# Altium PCB electronic_dc_load_v2.PcbDoc (part 3 of 4)
Units mm, origin at the board's own origin, x right, y up, seen from the top; angles counter-clockwise.
Board outline 170 x 170 mm, 4 copper layers (Top Layer, Int1(GND), Int2, Bottom Layer(PWR)), stack 1.607 mm thick; 177 components, 118 nets, 502 pads, 141 vias.
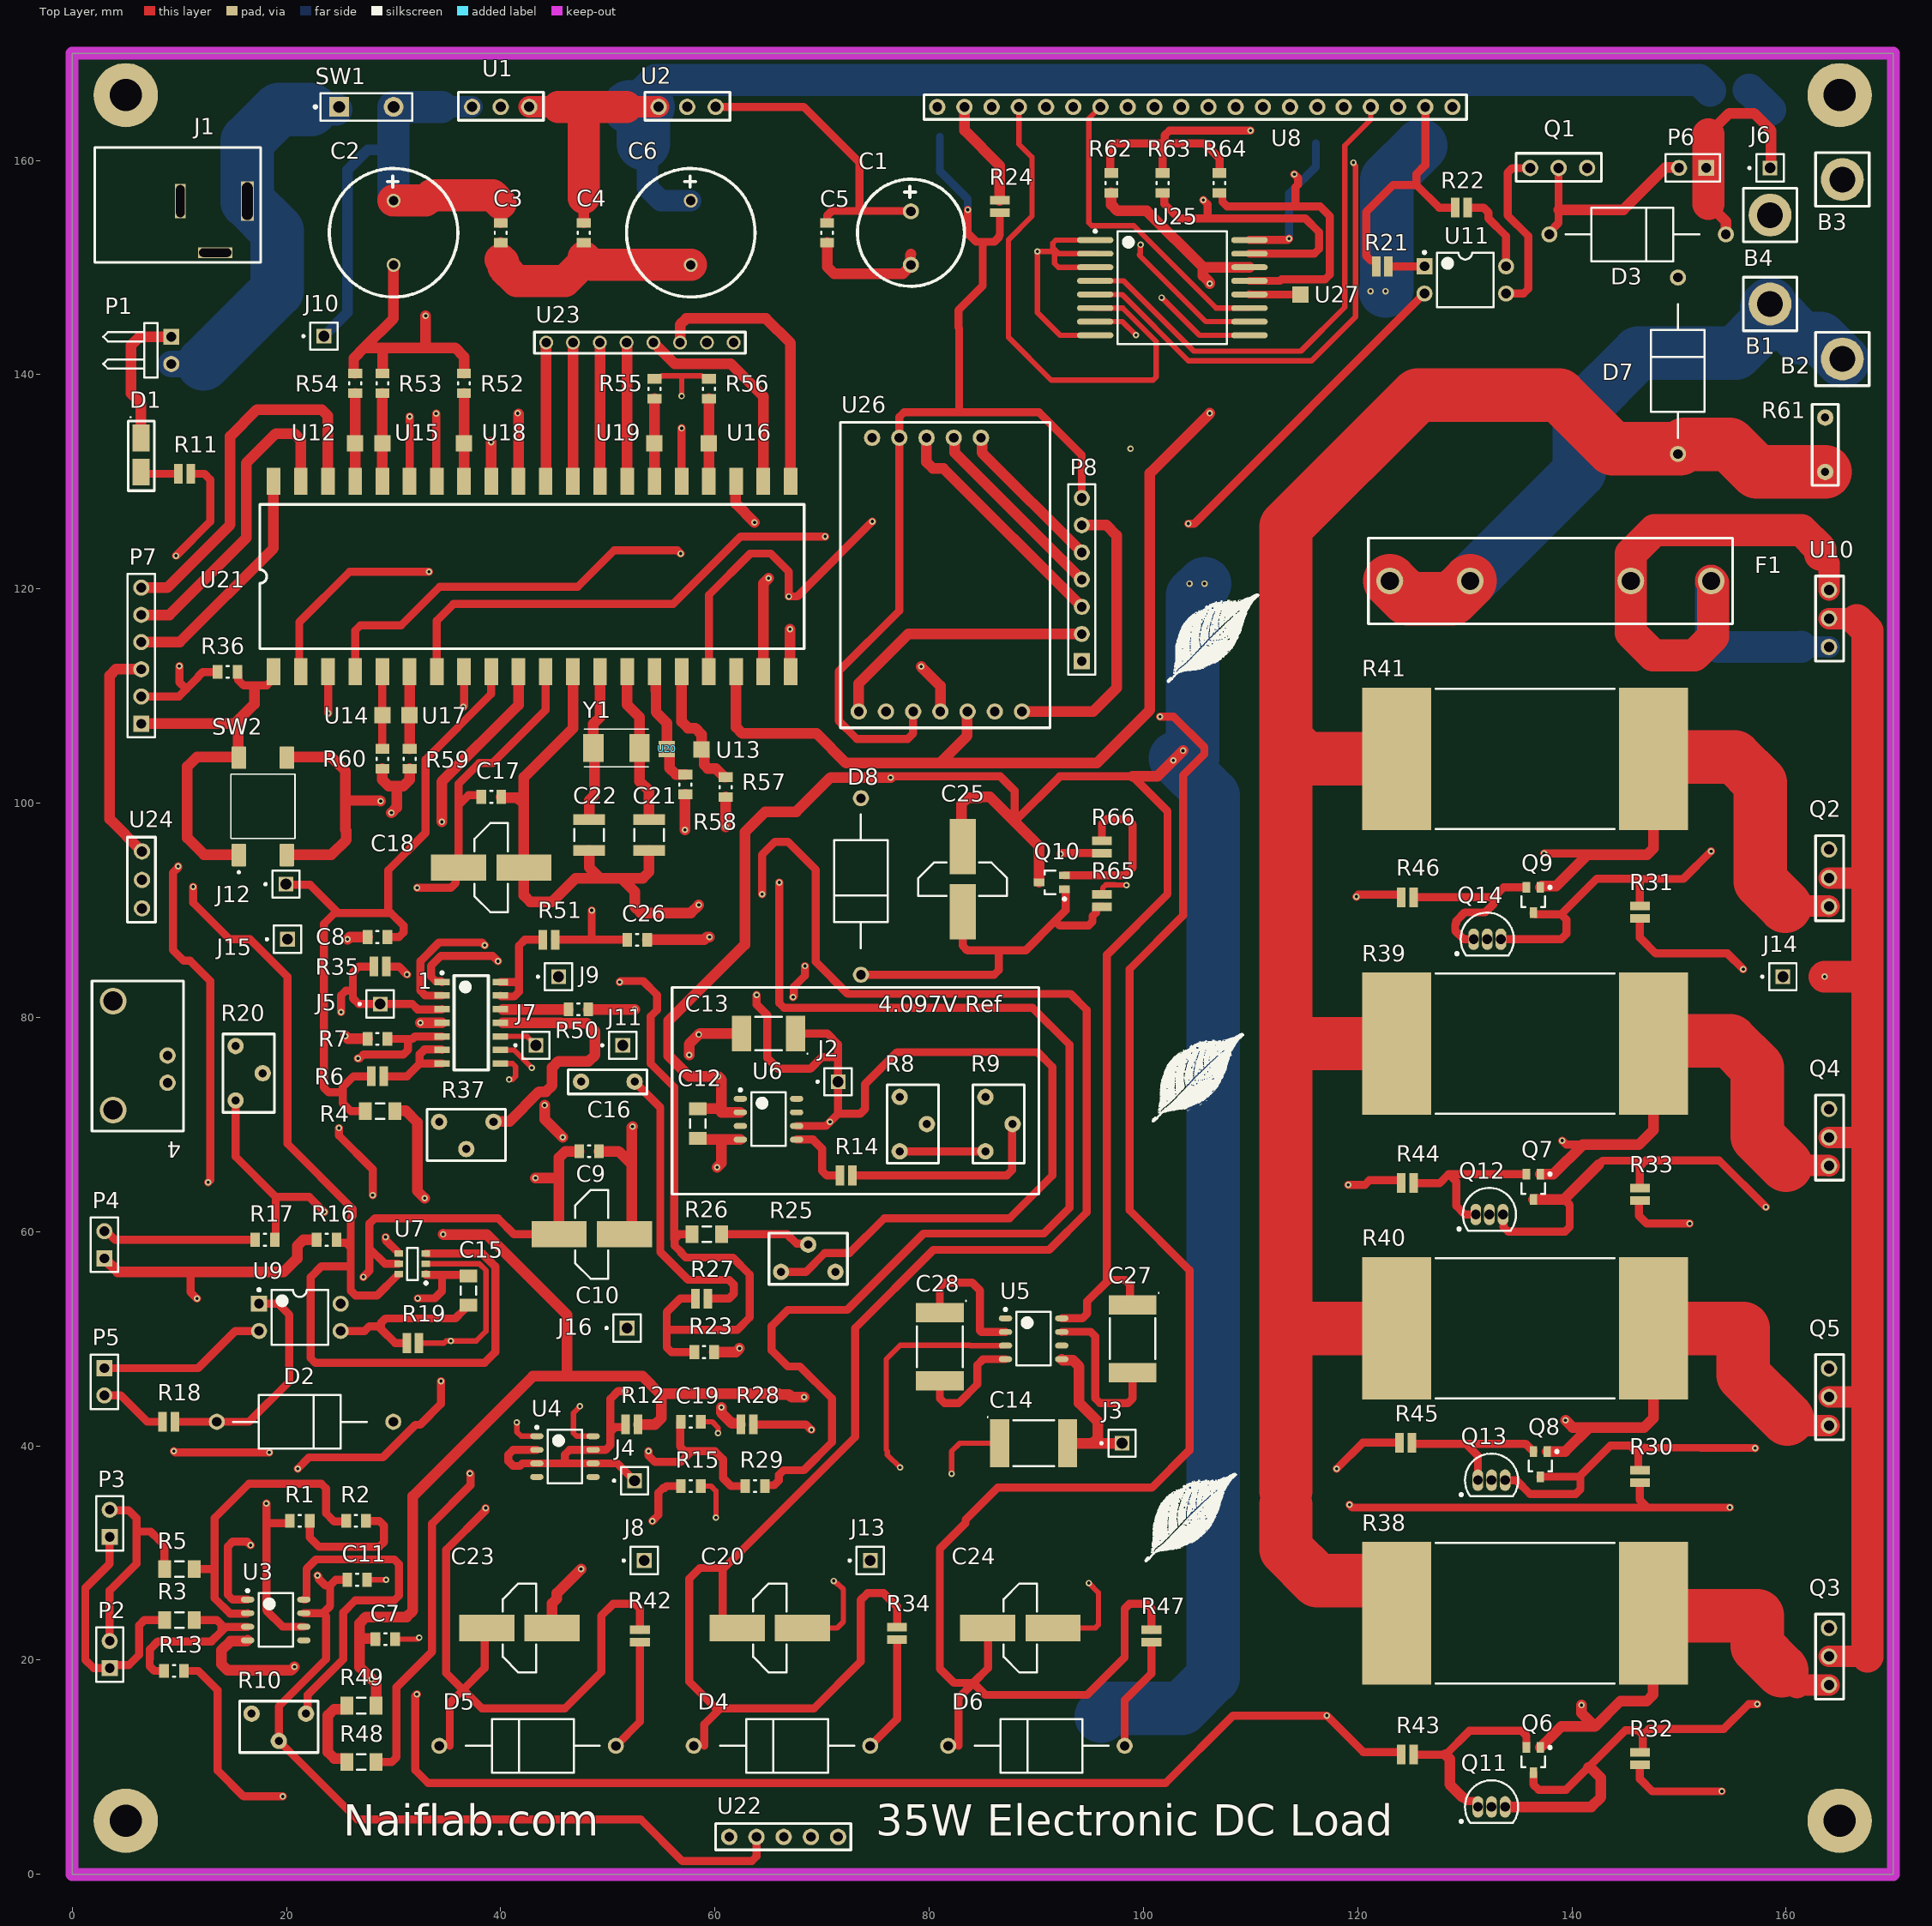
[diagram p0: Top Layer view]

## Via types
v1: diameter 0.6, hole 0.3, Top Layer to Bottom Layer(PWR), 141 vias

## Nets (pads, with @x,y where several pads share a name; then routed paths per layer and width w, separated by ;. In a path a pad name is that pad's centre, name@x,y a point inside that pad or via, vN(x,y) a via of type N, cw(c..) or ccw(c..) an arc to the next point about the centre after c; other vN are vias at no path point) (continued)
+5: (continued)
  Top Layer w1: P4.1@3,57.5 4.25,56.25 11.05,56.25 19.75,56.25 21,57.5 21,58.664 21.586,59.25 R16.2@22.825,59.25 ; v1(32.5,79.5) 1.4@34.525,79.5 ; v1(39.1,133.7) 39.116,133.684 U21.32@39.116,130.048 ; v1(43.25,65) 45.45,65 ; C10.1@45.45,59.75 45.45,65 ; C9.1@47.325,67.5 46.036,67.5 45.45,66.914 45.45,65 ; C12.1@58.415,71.475 58.44,71.5 60.25,71.5 60.615,71.135 ; U6.2@62.375,71.135 60.615,71.135 ; v1(76.4,102.4) 70.8,102.4 67.6,99.2 64.7,99.2 62.8,97.3 62.8,86.8 55.7,79.7 55.7,76.4 57.6,74.5 v1(60.3,74.5) 60.615,74.185 60.615,71.135 ; C25.1@83.13,95.96 83,96.09 83,99.914 83.586,100.5 84.75,100.5 84.836,100.586 85.664,100.586 87.972,98.278 90.28,95.97 Q10.3@90.28,92.61 ; 99,102.5 101.3,102.5 v1(102.8,104) v1(103.7,104.9)
  Int2 w0.75: v1(9.7,123.1) 9.7,113.1 v1(10,112.8) ; v1(22.9,27.9) 17.7,33.1 17.3,33.1 16.1,34.3 16.1,44.5 11.65,48.95 v1(11.65,53.75) 14.325,56.425 21.905,56.425 U9.4@25.06,53.27 27.175,55.385 v1(27.175,55.775) ; v1(76.4,102.4) 76.4,105.4 78.5,107.5 78.5,108.554 U26.3@78.506,108.56
  Int2 w1: v1(32.5,79.5) 32.5,76.25 36.984,71.766 39.958,71.766 43.25,68.474 ; v1(43.25,65) 43.25,68.474 ; v1(60.3,74.5) 57.6,74.5 54.5,71.4 46.176,71.4 43.25,68.474
  Int2 w5: v1(105.7,120.5) 122.6,137.4 v1(122.6,147.8) 122.55,147.75 122.55,147.85 v1@122.6,147.9
  Bottom Layer(PWR) w0.75: 81,162.2 81,159 83.6,156.4 v1(83.6,155.4) ; v1(113.6,152.7) 113.6,156.9 116.1,159.4 116.1,161.6
  Bottom Layer(PWR) w5: 96.047,14.753 96.799,15.504 103.571,15.504 106.5,18.433 106.5,100.7 v1@103,104.2 ; 104.6,104.2 104.6,119.4 v1(105.7,120.5) ; v1(122.6,147.8) 122.734,147.934 122.734,158.234 125.9,161.4
  other v1: 104.3,120.5 121.2,147.8
+12: C4.1 C6.1 D3.K J6.01 P6.1 U1.3 U2.1 | length 161.9
  Top Layer w1: C4.1@47.75,154.175 47.75,156.5 ; 152.75,155.95 154.375,154.325 D3.K@154.375,153.1 D3.K@154.375,153.083 ; 152.75,162.45 154.7,164.4 157,164.4 158.6,162.8 158.6,159.4 J6.01@158.5,159.3
  Top Layer w2: U1.3@42.66,165 45.4,165 ; 51.7,165 U2.1@54.75,165
  Top Layer w3: 45.4,165 47.75,165 51.7,165 ; 47.75,156.5 47.75,163.75 ; 152.75,155.95 152.75,162.45
  Bottom Layer(PWR) w2: 53.325,161.6 53.7,161.225 53.7,157.5 54.95,156.25 C6.1@57.75,156.25
  Bottom Layer(PWR) w3: 52,165 52,165.043 54.473,167.516 151.884,167.516 152.9,166.5 ; 156.5,166.6 156.6,166.6 158.5,164.7
  Bottom Layer(PWR) w5: 52,165 53.75,165 53.325,164.575 53.325,161.6
-2.5V: J4.01 R12.1 R25.1 U4.2 U4.3 U4.6 U4.7 | length 54.8
  Top Layer w0.75: U4.3@43.125,38.365 42.04,38.365 41.8,38.125 41.164,38.125 40.725,38.564 40.725,39.196 41.164,39.635 U4.2@43.375,39.635 ; U4.3@43.375,38.365 46,38.365 ; v1(51.6,45.125) 50.975,45.125 50.25,44.4 50.25,41.311 ; R12.1@51.675,42 51.675,41.775 51.65,41.75 50.689,41.75 50.25,41.311 ; J4.01@52.5,36.75 51.105,38.145 50.885,38.365 U4.6@48.625,38.365 46,38.365 ; 46,38.365 46,39.196 46.439,39.635 49.811,39.635 50.25,40.074 50.25,41.311
  Int2 w0.75: v1(51.6,45.125) 55.85,45.125 57.775,47.05 64.336,47.05 67.719,50.433 67.719,52.719 R25.1@71.25,56.25